# Altium PCB 环境监测系统PCB.PcbDoc
Units mm, origin at the board's own origin, x right, y up, seen from the top; angles counter-clockwise.
Board outline 97 x 57.18 mm, 2 copper layers (Top Layer, Bottom Layer); 11 components, 15 nets, 83 pads, 0 vias.
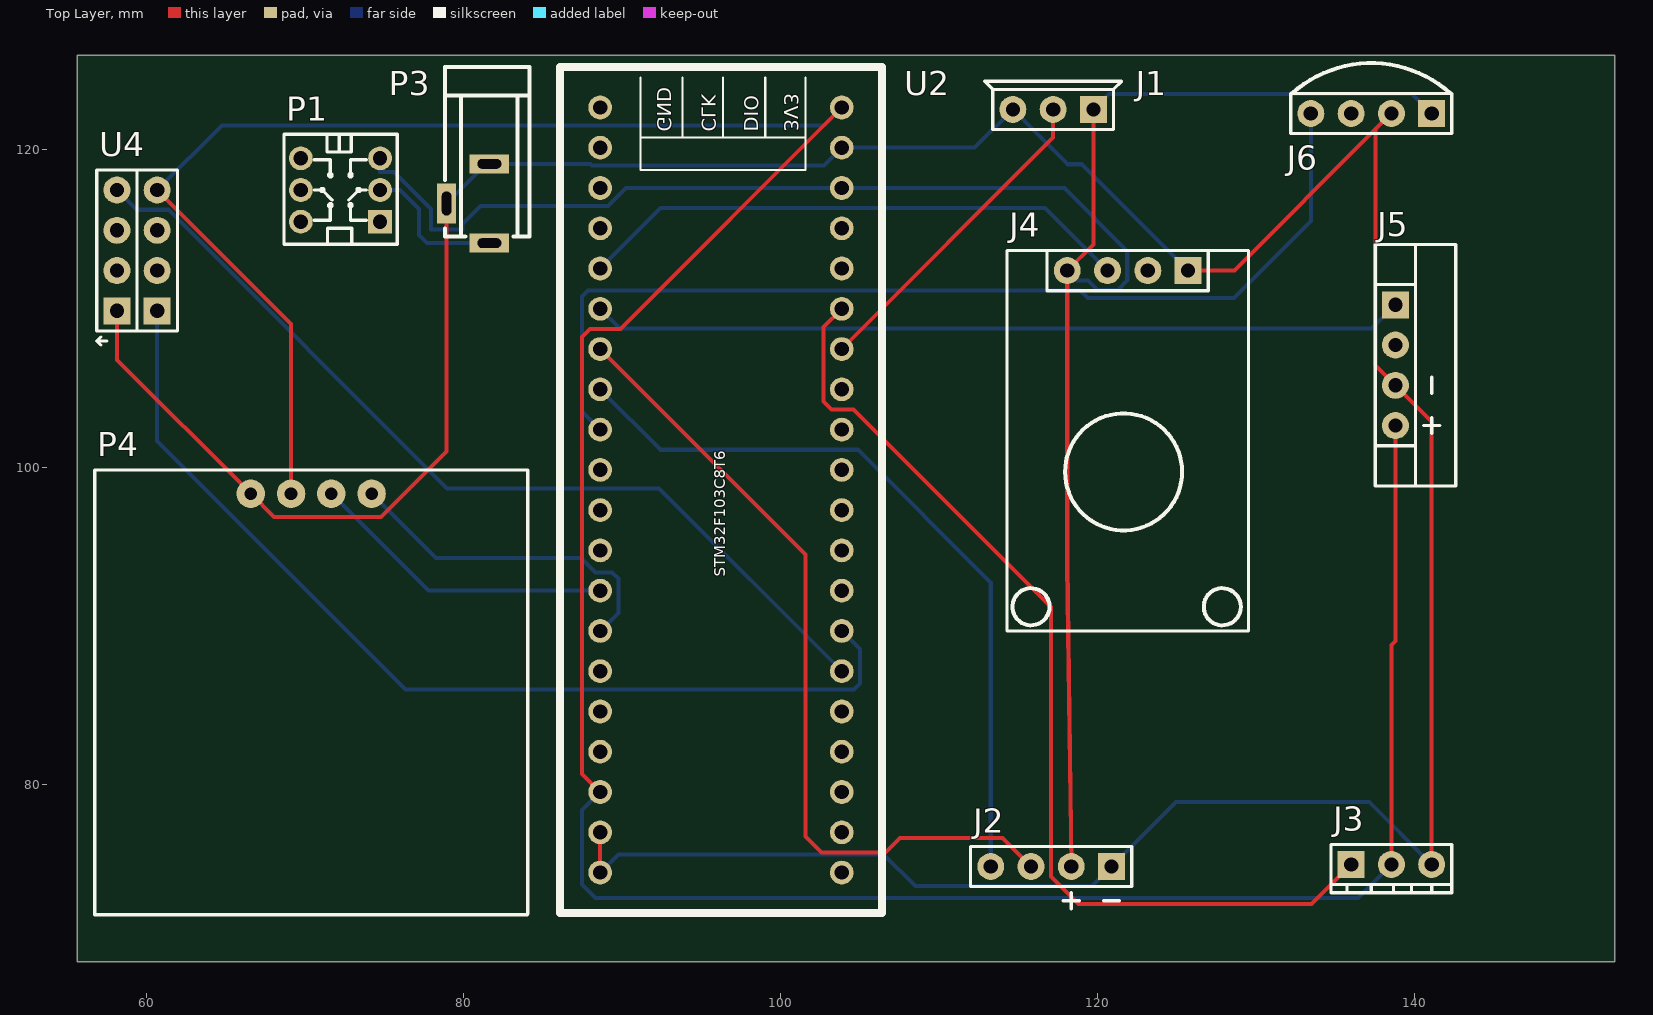
[diagram p0: Top Layer view]
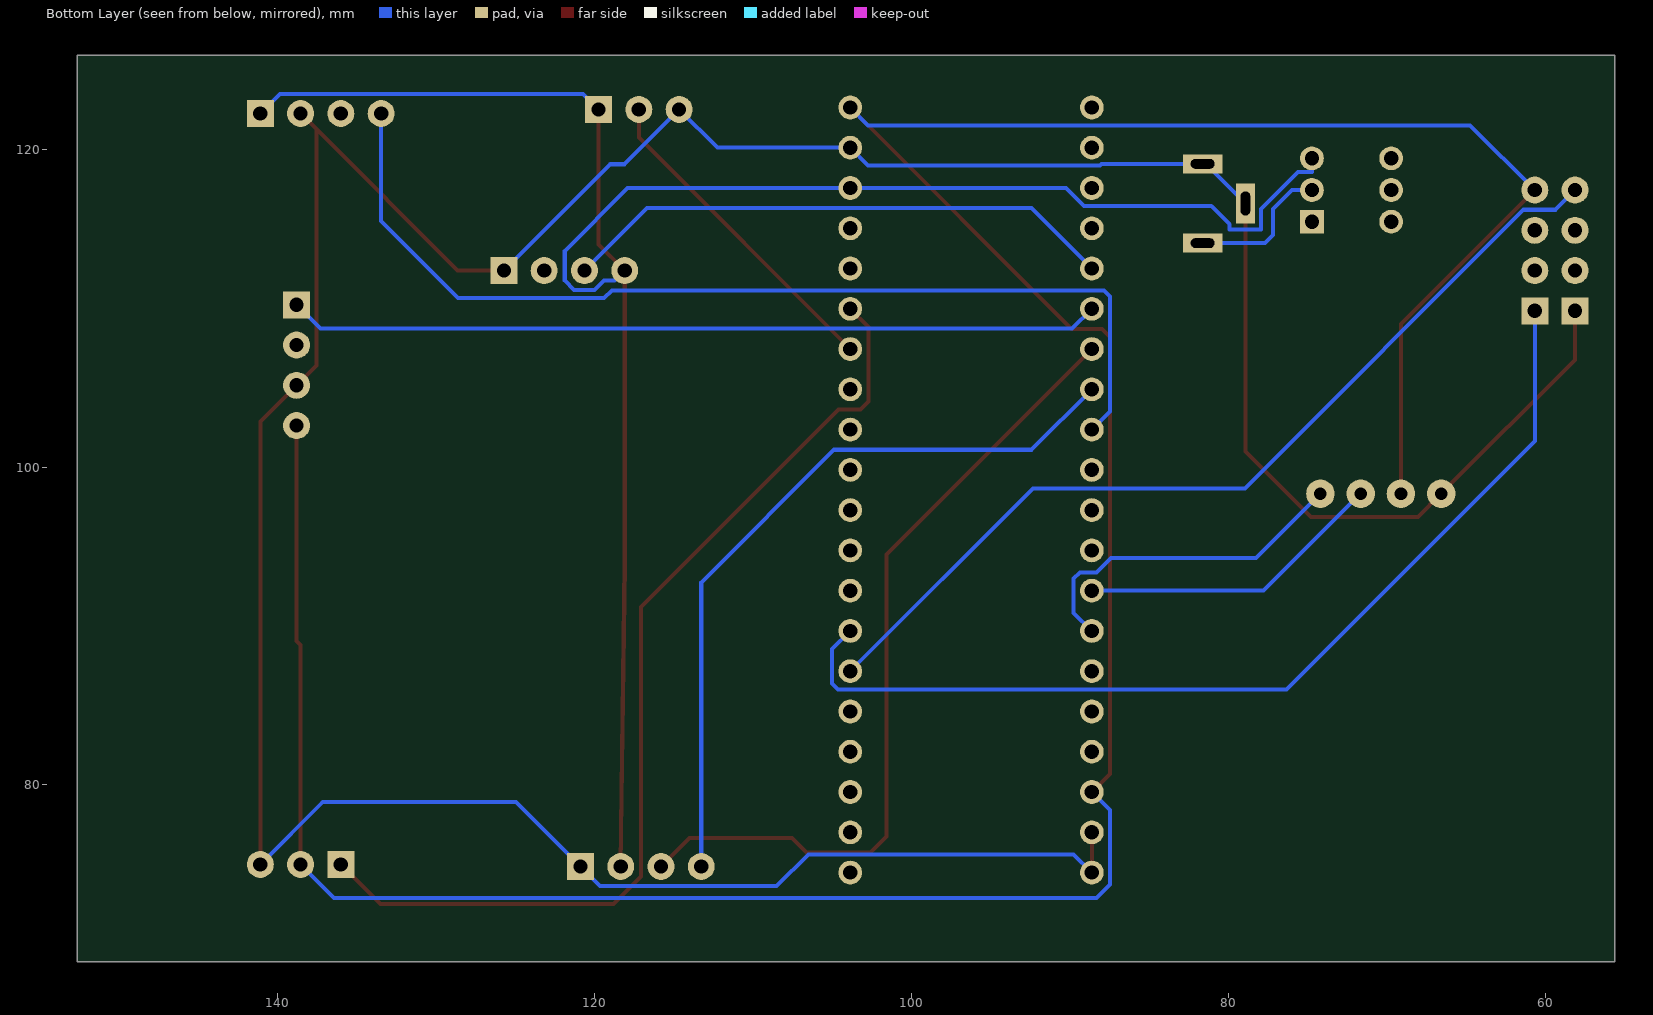
[diagram p1: Bottom Layer view, seen from below]

## Layer stack, top to bottom
Top Solder: solder mask 0.0102, Solder Resist, Dk 3.5
Top Layer: signal copper 0.0356
Dielectric 1: dielectric 0.32, FR-4, Dk 4.8
Bottom Layer: signal copper 0.0356
Bottom Solder: solder mask 0.0102, Solder Resist, Dk 3.5

## Board outline
55.654,68.806 152.654,68.806 152.654,125.984 55.654,125.984

## Design rules (kind name [scope] priority, off if disabled: settings)
Clearance [All] p1: gap=0.254 ignorepadtopadclearanceinfootprint=FALSE except(0: Arc-Hole Track-Hole SMDPad-Hole THPad-Hole Via-Hole Fill-Hole Poly-Hole Region-Hole Text-Hole)
PolygonConnect [All] p1: connectstyle=Relief reliefconductorwidth=0.254 reliefentries=4 polygonreliefangle="90 Angle" airgapwidth=0.254
RoutingVias [All] p1: holewidth=0.711 width=1.27 viastyle="Through Hole" minholewidth=0.711 minwidth=1.27 maxholewidth=0.711 maxwidth=1.27
SolderMaskExpansion [All] p1: expansion=0.102
Width [All] p1: maxlimit=0.254 minlimit=0.254 preferedwidth=0.254
30 further rules are at their usual default settings.

## Components (designator, comment, footprint, x,y, rotation, side; value= is the part's Value field where it differs from the comment)
J1 "BEEP" BEEP 117.221,122.555 r180 top
J2 "PM25Sensor" PM25Sensor 117.094,74.803 r180 top
J3 "DHT11" DHT11 138.557,74.93 r0 top
J4 "HCHOSensor" HCHOSensor 121.92,112.395 r180 top
J5 "LightSensor" LightSensor 138.811,106.426 r270 top
J6 "MQX" MQX 137.287,122.301 r180 top
P1 "开关" "KFT DIP-7X7" 72.263,117.475 r90 top
P3 "电源插座" DC-002 81.661,119.126 r90 top
P4 "OLED-4 IIC" "OLED 0.96-4P" 74.549,82.931 r0 top
U2 "STM32F103C8T6" STM32F103C8T6 88.646,122.682 r0 top
U4 "ESP826601S" ESP-01S 60.706,113.665 r90 top

## Footprints (in the part's own frame and the unit in brackets; to place one, negate y for a bottom-side part, rotate by r counter-clockwise, add the part's x,y. Pads: shape width x height; smd on the part's side, far side on the other; paste and mask are expansions set on the pad)
BEEP [mm] "蜂鸣器"
  rect 1.7x1.7 hole 0.9: 1(-2.54,0)
  round 1.7 hole 0.9: 2(0,0) 3(2.54,0)
  silkscreen extent -4.32,-1.78 4.32,1.27, body extent -3.81,-1.27 3.81,1.27, height 8.5
DC-002 [mm] "3.5*1.1mm,       淘宝ID:黄晶宝石"
  rect 1.2x2.5 hole 0.6 slot 1.5 at 90 deg: 1(-5,0) 2(0,0)
  rect 2.5x1.2 hole 0.6 slot 1.5 at 0 deg: 3(-2.5,2.7)
  silkscreen extent -4.57,-2.54 6.1,2.79, body extent -5.3,-2.5 6,2.85, height 7.3
DHT11 [mm] "排针，3脚"
  rect 1.7x1.7 hole 0.9: 1(-2.54,0)
  round 1.7 hole 0.9: 2(0,0) 3(2.54,0)
  silkscreen extent -3.81,-1.78 3.81,1.27, body extent -3.81,-1.27 3.81,1.27, height 8.5
ESP-01S [mm] "排母，4脚"
  rect 1.7x1.7 hole 0.9: 1(-3.81,0) 5(-3.81,2.54)
  round 1.7 hole 0.9: 2(-1.27,0) 3(1.27,0) 4(3.81,0) 6(-1.27,2.54) 7(1.27,2.54) 8(3.81,2.54)
  silkscreen extent -5.97,-1.27 5.08,3.81, body extent -5.08,-1.27 5.08,3.81, height 8.5
HCHOSensor [mm] "甲醛传感器"
  rect 1.7x1.7 hole 0.9: 1(-3.81,0)
  round 1.7 hole 0.9: 2(-1.27,0) 3(1.27,0) 4(3.81,0)
  silkscreen extent -7.62,-1.27 7.62,22.73, body extent -5.08,-1.27 5.08,1.27, height 8.5
"KFT DIP-7X7" [mm] "自锁开关，规格：7*7mm"
  rect 1.5x1.5 hole 0.9: 1(-2,-2.5)
  round 1.5 hole 0.9: 2(0,-2.5) 3(2,-2.5) 4(2,2.5) 5(0,2.5) 6(-2,2.5)
  silkscreen extent -3.42,-3.58 3.51,3.56, body extent -3.5,-3.5 3.5,3.5, height 11.2
LightSensor [mm] "光敏传感器"
  rect 1.7x1.7 hole 0.9: 1(-3.81,0)
  round 1.7 hole 0.9: 2(-1.27,0) 3(1.27,0) 4(3.81,0)
  silkscreen extent -7.62,-1.27 7.62,3.81, body extent -5.08,-1.27 5.08,1.27, height 8.5
MQX [mm] "排针，4脚"
  rect 1.7x1.7 hole 0.9: 1(-3.81,0)
  round 1.7 hole 0.9: 2(-1.27,0) 3(1.27,0) 4(3.81,0)
  silkscreen extent -5.08,-3.17 5.08,1.27, body extent -5.08,-1.27 5.08,1.27, height 8.5
"OLED 0.96-4P" [mm] "长：35.4mm，宽：33.5mm，"
  round 1.8 hole 0.8: 1(-7.94,15.391) 2(-5.4,15.391) 3(-2.86,15.391) 4(-0.32,15.391)
  silkscreen extent -17.78,-11.18 9.53,16.89, body extent -17.66,-10.81 9.54,16.39, height 3
PM25Sensor [mm] "PM25传感器"
  rect 1.7x1.7 hole 0.9: 1(-3.81,0)
  round 1.7 hole 0.9: 2(-1.27,0) 3(1.27,0) 4(3.81,0)
  silkscreen extent -5.08,-1.27 5.08,2.67, body extent -5.08,-1.27 5.08,1.27, height 8.5
STM32F103C8T6 [mm]
  round 1.5 hole 0.9: 1(0,0) 2(0,-2.54) 3(0,-5.08) 4(0,-7.62) 5(0,-10.16) 6(0,-12.7) 7(0,-15.24) 8(0,-17.78) 9(0,-20.32) 10(0,-22.86) 11(0,-25.4) 12(0,-27.94) 13(0,-30.48) 14(0,-33.02) 15(0,-35.56) 16(0,-38.1) 17(0,-40.64) 18(0,-43.18) 19(0,-45.72) 20(0,-48.26) 21(15.24,-48.26) 22(15.24,-45.72) 23(15.24,-43.18) 24(15.24,-40.64) 25(15.24,-38.1) 26(15.24,-35.56) 27(15.24,-33.02) 28(15.24,-30.48) 29(15.24,-27.94) 30(15.24,-25.4) 31(15.24,-22.86) 32(15.24,-20.32) 33(15.24,-17.78) 34(15.24,-15.24) 35(15.24,-12.7) 36(15.24,-10.16) 37(15.24,-7.62) 38(15.24,-5.08) 39(15.24,-2.54) 40(15.24,0)
  silkscreen extent -2.54,-50.8 17.78,2.54

## Part data
J1: "蜂鸣器"
J2: "PM25传感器"
J3: "温湿度传感器"
J4: "甲醛传感器"
J5: "光敏传感器"
J6: "二氧化碳传感器"
P1: library part Switch
P3: library part POWER, "3PIN"
P4: "4PIN"
U2: "40PIN"

## Nets (pads, with @x,y where several pads share a name; then routed paths per layer and width w, separated by ;. In a path a pad name is that pad's centre, name@x,y a point inside that pad or via, vN(x,y) a via of type N, cw(c..) or ccw(c..) an arc to the next point about the centre after c; other vN are vias at no path point)
GND: J1.3 J2.1 J3.3 J4.1 J5.3 J6.2 P3.2 P3.3 P4.1 U2.19 U2.20 U2.39 U4.5 | length 223.8
  Top Layer w0.254: U4.5 58.166,106.765 P4.1 68.081,96.85 74.828,96.85 78.961,100.983 P3.3 ; U2.20 U2.19 ; J4.1 128.651,112.395 137.566,121.31 ; J6.2 137.566,121.31 ; J3.3 141.097,102.87 J5.3 137.566,106.401 137.566,121.31
  Bottom Layer w0.254: P3.3 81.461,119.126 P3.2 88.023,119.126 88.138,119.011 102.755,119.011 U2.39 112.268,120.142 J1.3 118.135,119.101 119.024,119.101 J4.1 ; U2.20 89.789,75.565 106.528,75.565 108.534,73.558 119.659,73.558 J2.1 124.968,78.867 137.16,78.867 J3.3
NetP1_2: P1.2 P3.1 | length 9.3
  Bottom Layer w0.254: P1.2 76.022,117.475 77.216,116.281 77.216,114.634 77.724,114.126 P3.1
PA0: J4.3 U2.5 | length 35.2
  Bottom Layer w0.254: U2.5 92.456,116.332 116.713,116.332 J4.3
PA1: J5.1 U2.6 | length 51.3
  Bottom Layer w0.254: U2.6 89.891,108.737 137.312,108.737 J5.1
PA2: J2.3 U2.7 | length 51.9
  Top Layer w0.254: U2.7 101.6,94.488 101.6,76.708 102.616,75.692 106.655,75.692 107.569,76.606 114.021,76.606 J2.3
PA3: J2.4 U2.8 | length 47.6
  Bottom Layer w0.254: U2.8 92.456,101.092 104.902,101.092 113.284,92.71 J2.4
PA4: J6.4 U2.9 | length 64
  Bottom Layer w0.254: U2.9 87.503,103.505 87.503,110.769 87.884,111.15 118.911,111.15 119.405,110.656 128.614,110.656 133.477,115.519 J6.4
PA9: U2.26 U4.8 | length 58.3
  Bottom Layer w0.254: U4.8 59.411,116.23 61.417,116.23 78.994,98.654 92.354,98.654 U2.26
PA10: U2.27 U4.1 | length 63
  Bottom Layer w0.254: U4.1 60.706,101.651 76.378,85.979 104.648,85.979 105.029,86.36 105.029,88.519 U2.27
PB0: P4.3 U2.13 | length 19.5
  Bottom Layer w0.254: P4.3 77.809,92.202 U2.13
PB1: P4.4 U2.14 | length 21.6
  Bottom Layer w0.254: P4.4 78.292,94.259 87.427,94.259 88.341,93.345 89.408,93.345 89.789,92.964 89.789,90.805 U2.14
PB6: J1.2 U2.34 | length 20.6
  Top Layer w0.254: U2.34 117.221,120.777 J1.2
PB7: J3.1 U2.35 | length 63.7
  Top Layer w0.254: U2.35 102.743,108.839 102.743,104.14 103.251,103.632 104.623,103.632 117.094,91.161 117.094,74.168 118.821,72.441 133.528,72.441 J3.1
VCC3.3: J3.2 J5.4 P4.2 U2.18 U2.40 U4.4 | length 205.9
  Top Layer w0.254: U4.4 69.149,109.032 P4.2 ; U2.18 87.503,80.645 87.503,108.204 88.011,108.712 89.916,108.712 U2.40 ; J3.2 138.557,88.773 138.811,89.027 J5.4
  Bottom Layer w0.254: U4.4 64.782,121.551 102.755,121.551 U2.40 ; U2.18 87.503,78.359 87.503,73.66 88.341,72.822 136.449,72.822 J3.2
VCC5: J1.1 J2.2 J4.4 J6.1 P1.3 U2.38 | length 130.3
  Top Layer w0.254: J2.2 118.11,93.853 J4.4 119.761,114.046 J1.1
  Bottom Layer w0.254: P1.3 74.763,118.618 75.641,118.618 77.978,116.281 77.978,114.986 79.959,114.986 79.959,115.316 81.114,116.471 89.154,116.471 90.285,117.602 U2.38 117.932,117.602 121.895,113.64 121.895,111.76 121.299,111.164 120.027,111.164 119.431,111.76 118.745,111.76 J4.4 ; J1.1 120.752,123.546 139.852,123.546 J6.1
pads on no net: J4.2 J5.2 J6.3 P1.1 P1.4 P1.5 P1.6 U2.1 U2.2 U2.3 U2.4 U2.10 U2.11 U2.12 U2.15 U2.16 U2.17 U2.21 U2.22 U2.23 U2.24 U2.25 U2.28 U2.29 U2.30 U2.31 U2.32 U2.33 U2.36 U2.37 U4.2 U4.3 U4.6 U4.7

## Silkscreen, mask and mechanical layers (free items; w line width, h text height)
Mechanical 1:
  the board outline again, w0.2

## Text inside footprints (layer, text, board x,y; h text height)
U2: Top Overlay "GND" at 91.948,121.158 h1.52 r270; Top Overlay "CLK" at 94.742,121.158 h1.52 r270; Top Overlay "DIO" at 97.409,121.158 h1.52 r270; Top Overlay "3V3" at 99.949,121.158 h1.52 r270